# Altium PCB PCB1.PcbDoc
Units mil, origin at the board's own origin, x right, y up, seen from the top; angles counter-clockwise.
Board outline 2414.87 x 2632.61 mil, 2 copper layers (Top Layer, Bottom Layer), stack 61.855 mil thick; 55 components, 29 nets, 125 pads, 37 vias.
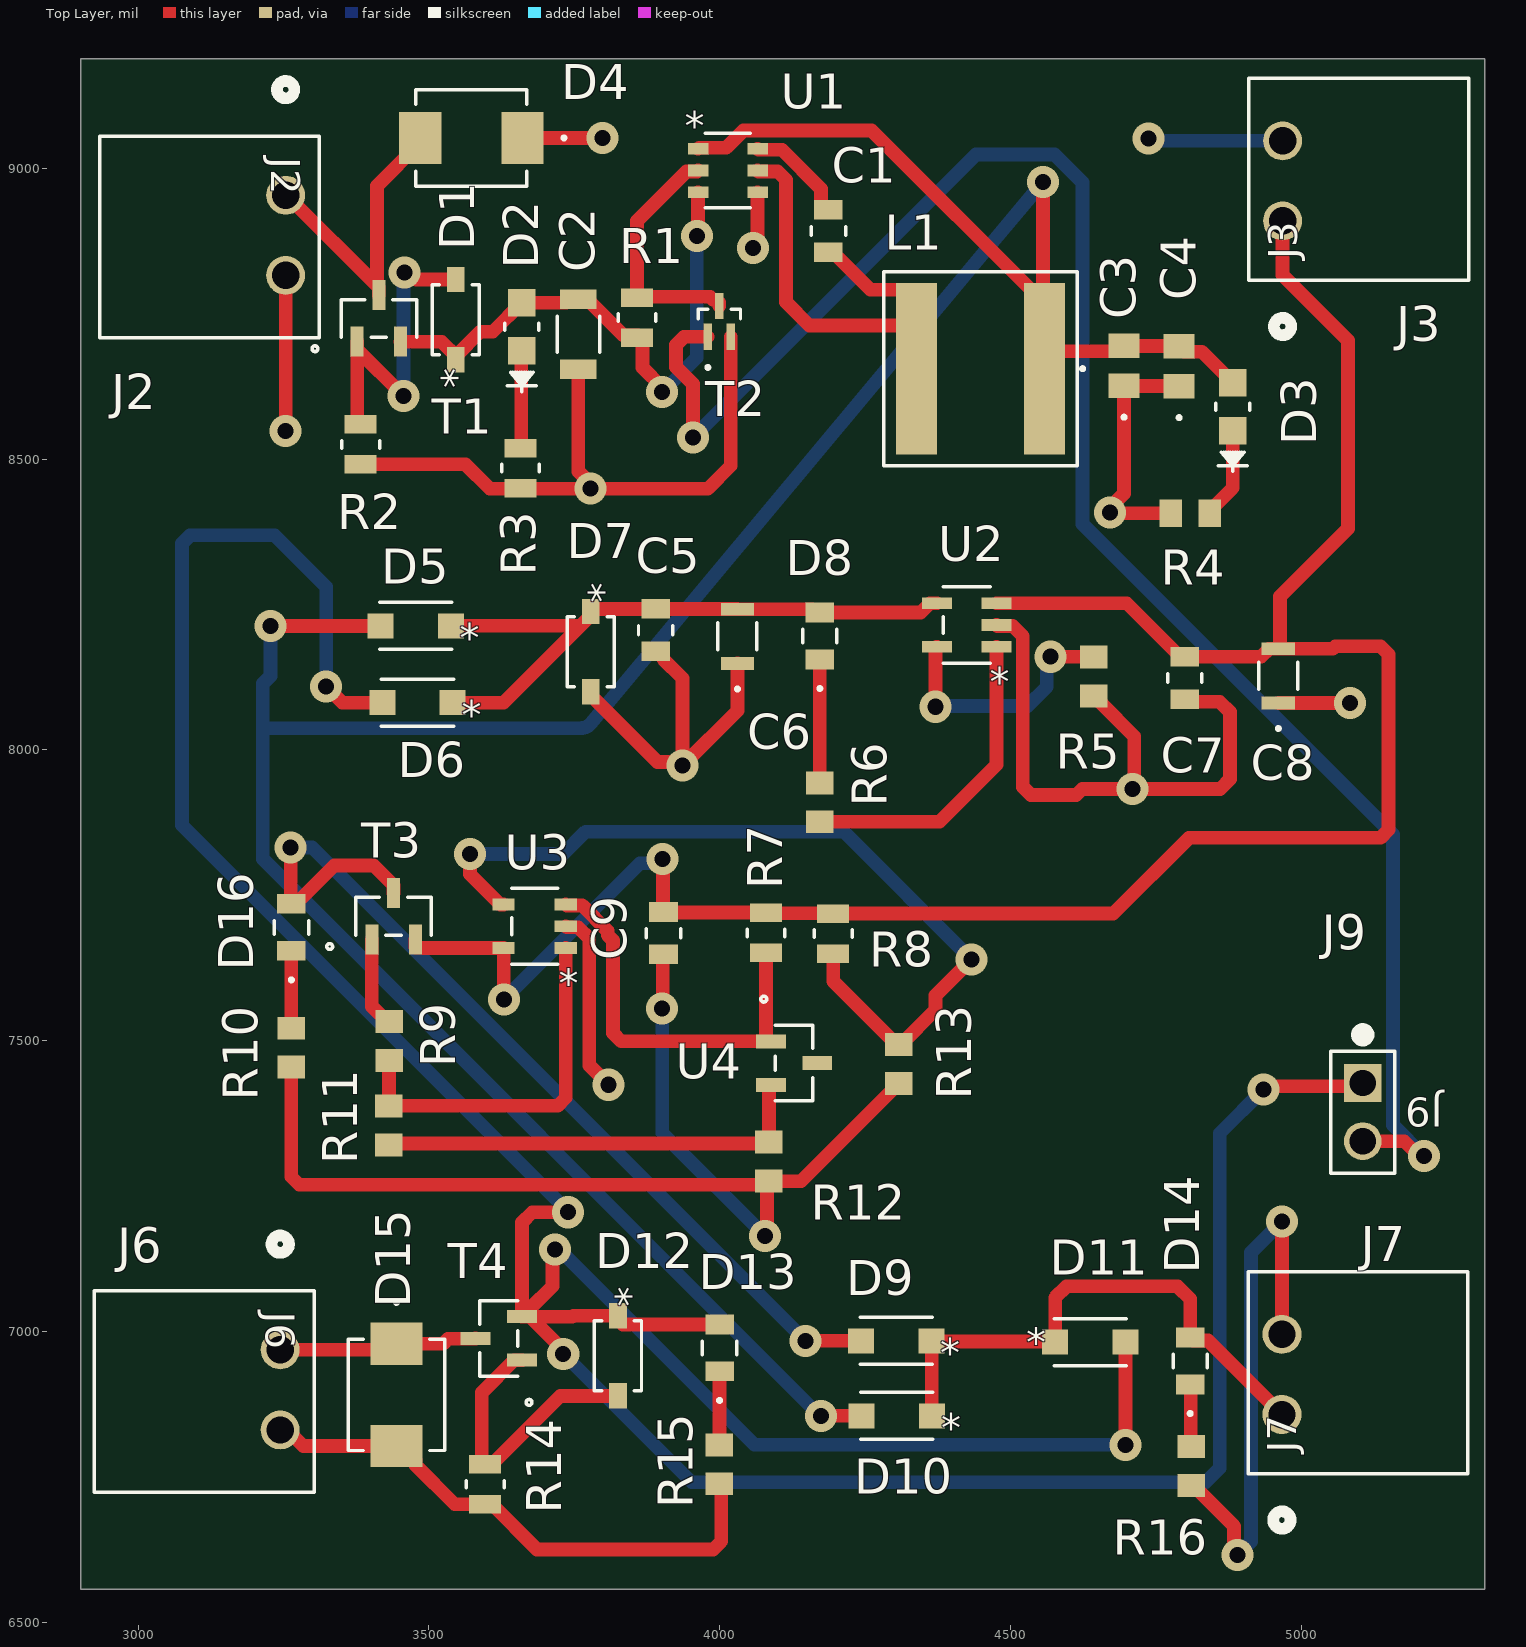
[diagram p0: Top Layer view]
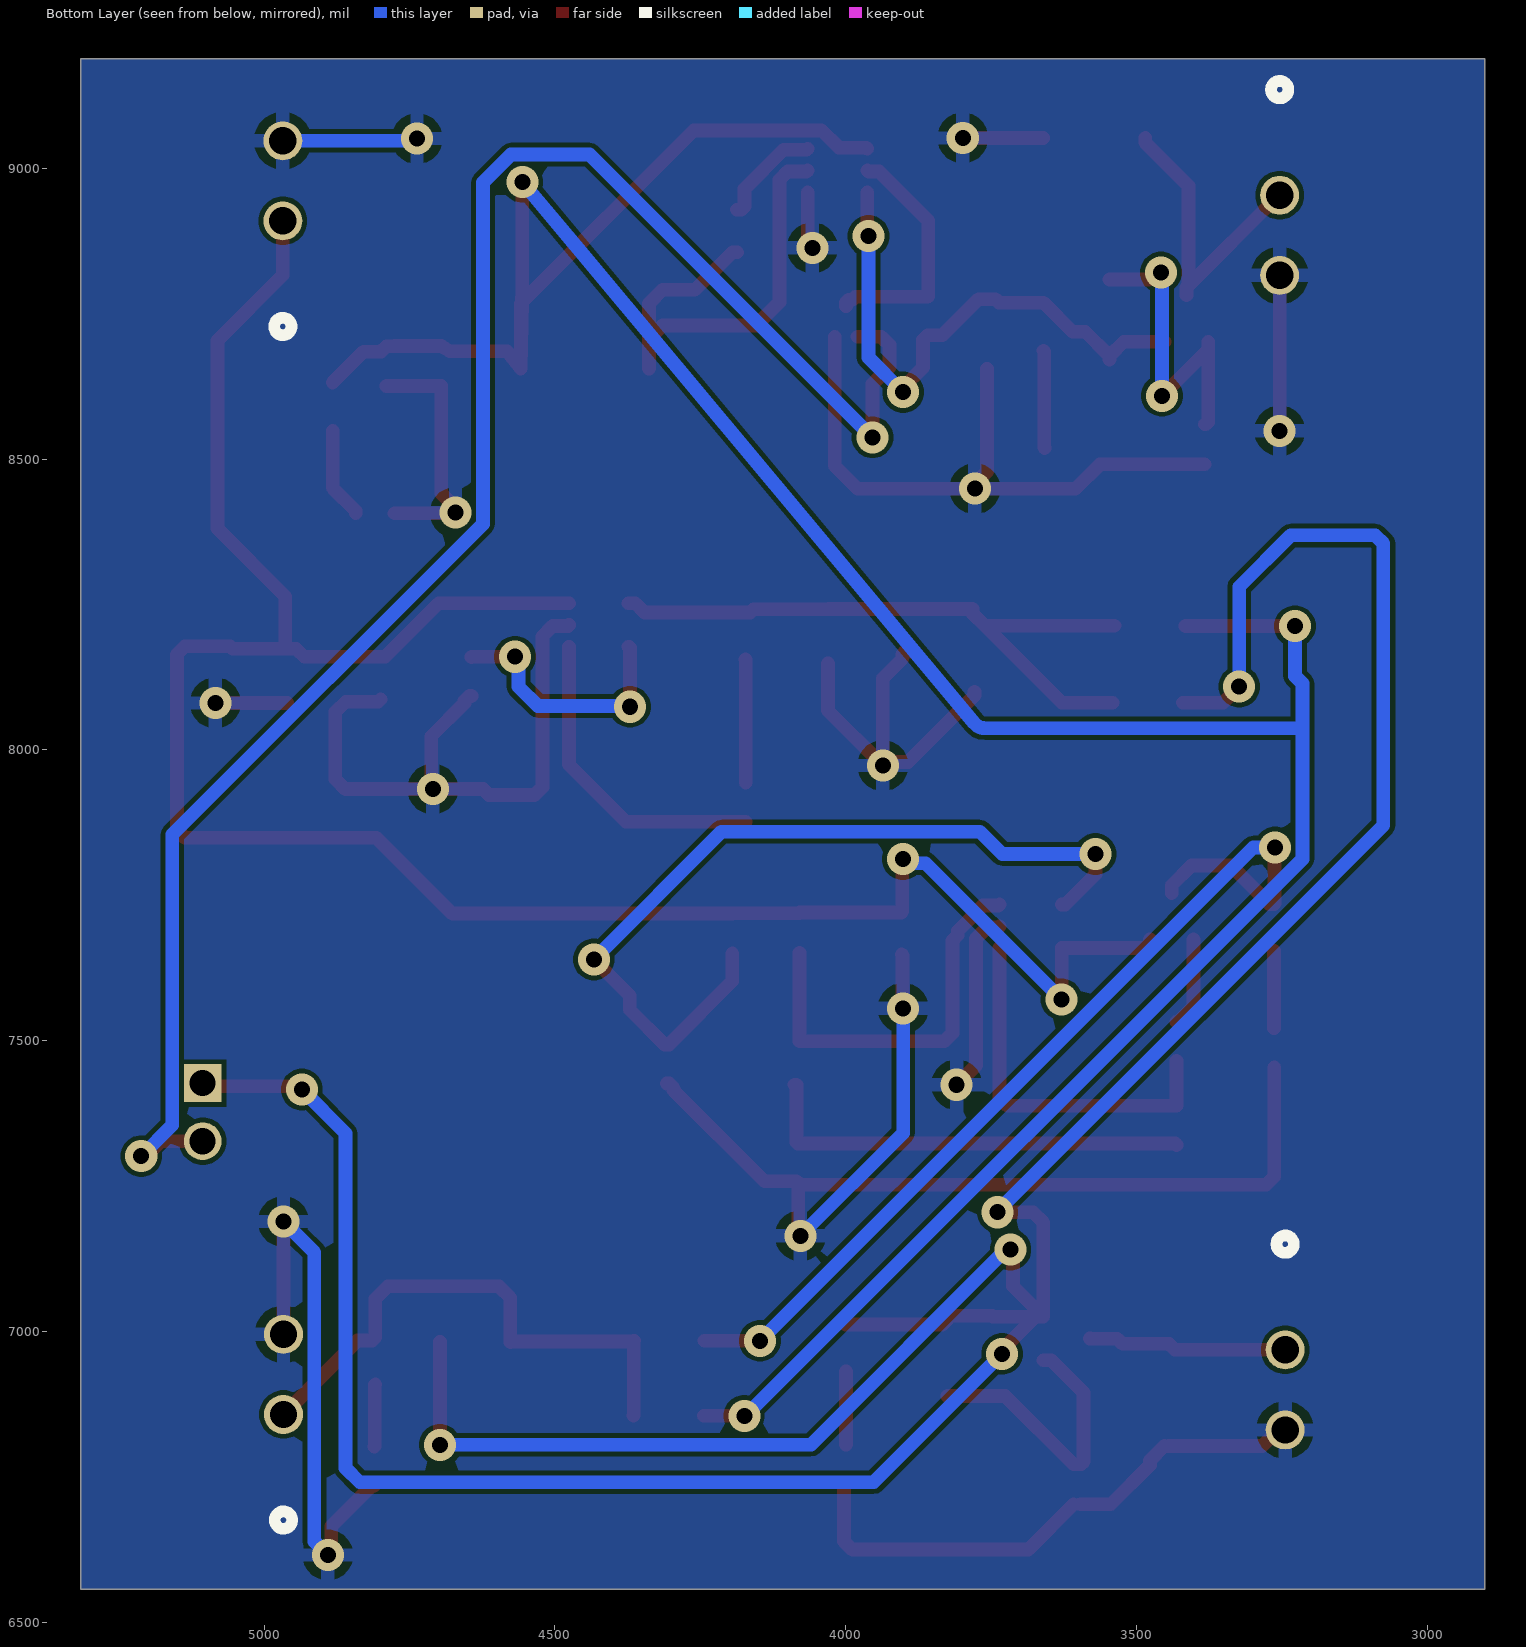
[diagram p1: Bottom Layer view, seen from below]
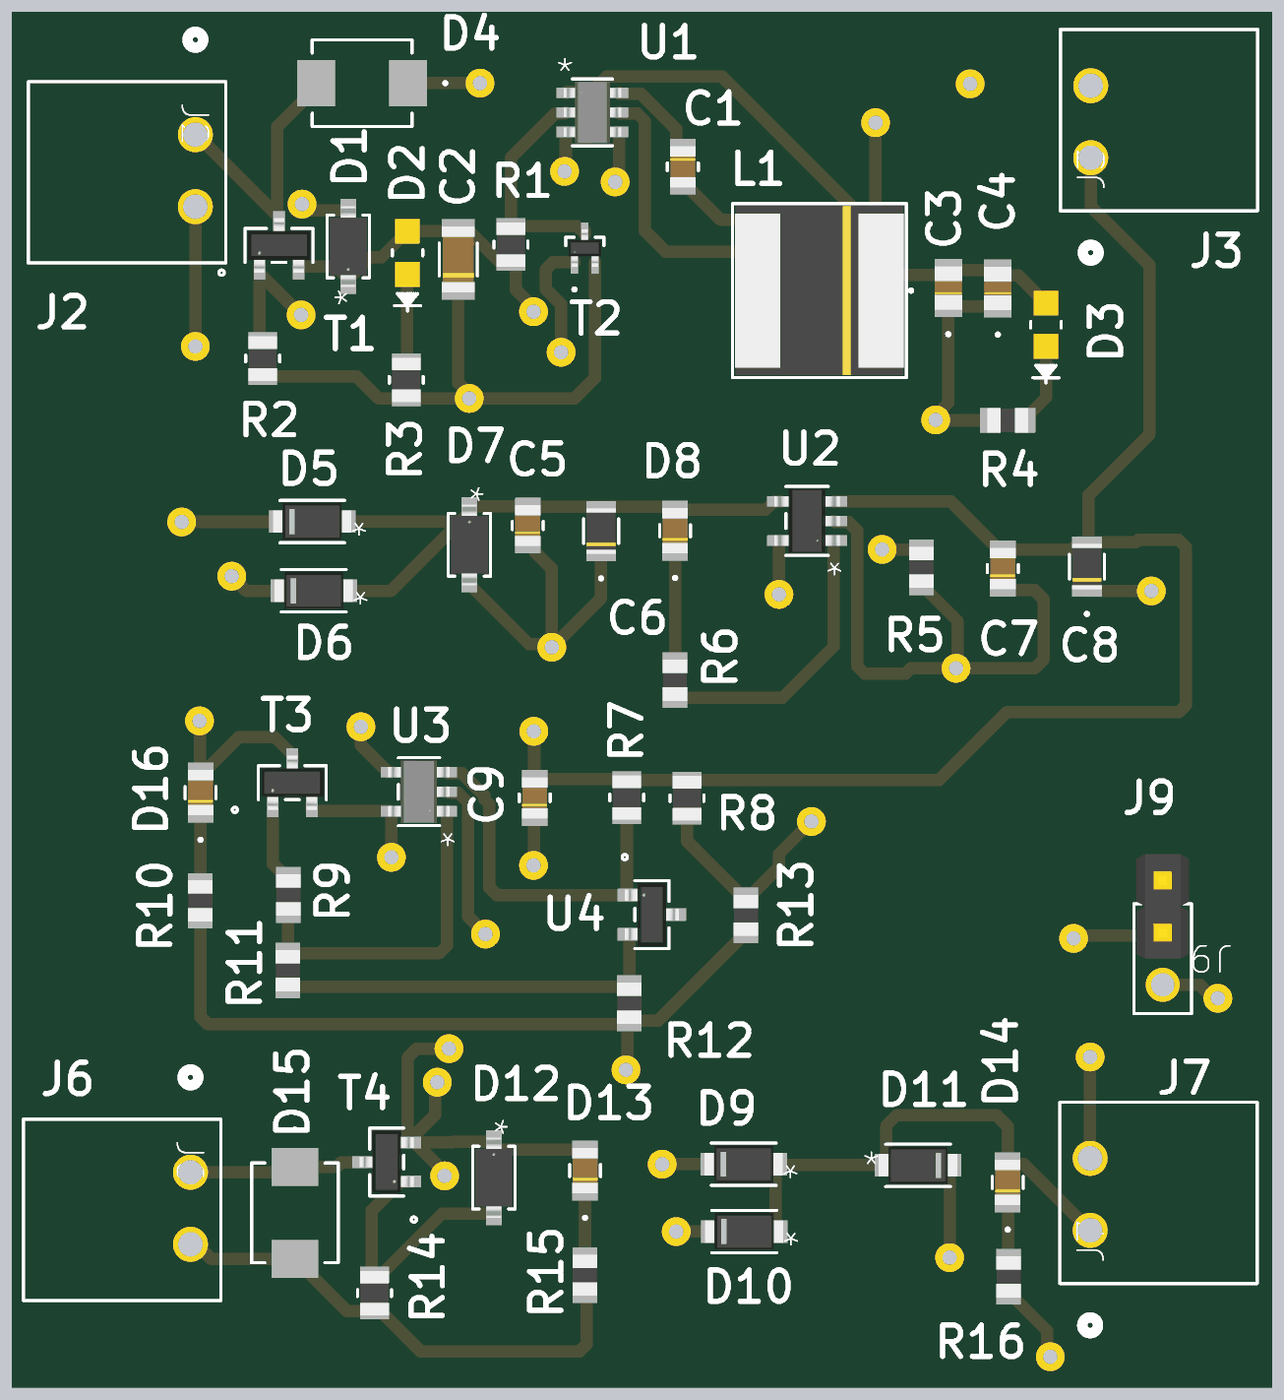
[diagram p2: 3D render of the assembled board from above, using the file's embedded part models]

## Layer stack, top to bottom
Top Solder: solder mask 1, SM-003, Dk 4
Top Layer: signal copper 1.4
Dielectric 1: dielectric 59.0551, FR-4, Dk 4.8
Bottom Layer: signal copper 1.4
Bottom Solder: solder mask 1, SM-003, Dk 4

## Board outline
2900.86,6556.37 5315.73,6556.37 5315.73,9188.98 2900.86,9188.98

## Design rules (kind name [scope] priority, off if disabled: settings)
Clearance [All] p1: gap=7.87 ignorepadtopadclearanceinfootprint=FALSE
MinimumSolderMaskSliver [All] p1: minsoldermaskwidth=3.94
PolygonConnect [All] p1: connectstyle=Relief reliefconductorwidth=23.62 reliefentries=4 polygonreliefangle="90 Angle" airgapwidth=15.75
RoutingVias [All] p1: holewidth=27.56 width=55.12 viastyle="Through Hole" minholewidth=27.56 minwidth=55.12 maxholewidth=27.56 maxwidth=55.12
SilkToSilkClearance [All] p1: silktosilkclearance=0
SilkToSolderMaskClearance [IsPad] p1: minsilkscreentomaskgap=0 clearancetoexposedcopper=TRUE
SolderMaskExpansion [All] p1: expansion=0 istentingtop=FALSE
SupplyNets "Schematic Supply Nets_7" [InNet('VBUS')] p1: voltage=0.000
SupplyNets "Schematic Supply Nets_6" [InNet('+5V_Ext')] p2: voltage=0.000
SupplyNets "Schematic Supply Nets_5" [InNet('+3.7V')] p3: voltage=0.000
SupplyNets "Schematic Supply Nets_4" [InNet('V_Battery')] p4: voltage=0.000
SupplyNets "Schematic Supply Nets_3" [InNet('VSYS')] p5: voltage=0.000
SupplyNets "Schematic Supply Nets_2" [InNet('VCC')] p6: voltage=0.000
SupplyNets "Schematic Supply Nets_1" [InNet('GND')] p7: voltage=0.000
SupplyNets "Schematic Supply Nets" [InNet('+5V_USB')] p8: voltage=0.000
Width [All] p1: maxlimit=78.74 minlimit=15.75 preferedwidth=23.62
27 further rules are at their usual default settings.

## Classes and differential pairs
component class Sheet6: D9 D10 D11 D12 D13 D14 D15 J6 J7 J9 MOSFET3 R14 R15 R16 T4
component class Sheet5: C9 D16 J3 R7 R8 R9 R10 R11 R12 R13 T3 U3 U4
component class Sheet4: C5 C6 C7 C8 D5 D6 D7 D8 R5 R6 U2
component class Sheet3: C1 C2 C3 C4 D1 D2 D3 D4 J2 L1 R1 R2 R3 R4 T1 T2 U1

## Components (designator, comment, footprint, x,y, rotation, side; value= is the part's Value field where it differs from the comment)
C1 "100nF, 25V" CAP_CL21_SAM 4186.93,8892.54 r270 top
C2 "10uF, 50V" CAP_CL31_SAM 3756.9,8715.11 r90 top
C3 "22uF, 25V" CAP_CL_21_SAM 4695.36,8660.52 r90 top
C4 "22uF, 25V" CAP_CL_21_SAM 4790.09,8659.71 r90 top
C5 "100nF, 25V" CAP_CL21_SAM 3889.93,8206.03 r90 top
C6 "4.7uF, 25V" CAP_2012_TDK 4030.45,8195.38 r90 top
C7 "100nF, 25V" CAP_CL21_SAM 4799.7,8123.79 r90 top
C8 "4.7uF, 25V" CAP_2012_TDK 4960.61,8127.4 r90 top
C9 "100nF" CAP_CL21_SAM 3903.37,7684.88 r90 top
D1 "MMSZ5246B-TP" ZDO_SOD123_MCC 3546.26,8739.94 r90 top
D2 "LTST-C170TBKT" LED_LTST-C170_DIO 3659.81,8727.95 r90 top
D3 "LTST-C170TBKT" LED_LTST-C170_DIO 4882.26,8590.41 r90 top
D4 "SMBJ6.0CA-TR" SMB_BI_STM 3572.82,9052.58 r180 top
D5 "MBR120VLSFT1G" SDO_SOD-123FL_ONS 3477.35,8213.52 r180 top
D6 "MBR120VLSFT1G" SDO_SOD-123FL_ONS 3480.25,8081.22 r180 top
D7 "MMSZ5246B-TP" ZDO_SOD123_MCC 3778.37,8169.11 r270 top
D8 "VAOL-S8SB4" LED_VCCLITE_0805_VCC 4172.11,8196 r90 top
D9 "MBR120VLSFT1G" SDO_SOD-123FL_ONS 4303.55,6983.95 r180 top
D10 "MBR120VLSFT1G" SDO_SOD-123FL_ONS 4304.56,6854.97 r180 top
D11 "MBR120VLSFT1G" SDO_SOD-123FL_ONS 4637.31,6981.75 r0 top
D12 "MMSZ5246B-TP" ZDO_SOD123_MCC 3824.98,6958.17 r270 top
D13 "VAOL-S8SB4" LED_VCCLITE_0805_VCC 3999.74,6971.67 r90 top
D14 "VAOL-S8SB4" LED_VCCLITE_0805_VCC 4809.09,6949.17 r90 top
D15 "SMBJ6.0CA-TR" SMB_BI_STM 3444.13,6890.75 r270 top
D16 "VAOL-S8SB4" LED_VCCLITE_0805_VCC 3263.38,7694.87 r90 top
J2 "TSW-101-07-G-D" CONN_1844210_PXC 3253.53,8953.99 r270 top
J3 "TSW-101-07-G-D" CONN_1844210_PXC 4967.99,8909.85 r90 top
J6 "TSW-101-07-G-D" CONN_1844210_PXC 3244.16,6968.43 r270 top
J7 "TSW-101-07-G-D" CONN_1844210_PXC 4966.87,6857.27 r90 top
J9 "CON1" TSW-101-07-G-D_SAI 5105.82,7427.2 r180 top
L1 "4.7uH" IND_TAIYO_NRS8040_TAY 4448.55,8655.64 r180 top
R1 "100kR" RES0805_CRG_TYCO_TYC 3857.75,8743.64 r90 top
R2 "10kR" RES0805_CRG_TYCO_TYC 3382.48,8525.6 r270 top
R3 "1kR" RES0805_CRG_TYCO_TYC 3657.4,8484.82 r270 top
R4 "470R" RC0805N_VIS 4809.17,8407.23 r180 top
R5 "2kR" RC0805N_PAN 4643.61,8126.2 r270 top
R6 "470R" RC0805N_VIS 4171.83,7910.03 r270 top
R7 "10KR" RES0805_CRG_TYCO_TYC 4079.56,7685.48 r270 top
R8 "100KR" RES0805_CRG_TYCO_TYC 4195.04,7684.29 r270 top
R9 "1 MR" RC0805N_PAN 3431.61,7499.19 r270 top
R10 "470R" RC0805N_VIS 3263.13,7487.93 r270 top
R11 "270kR" RC0805N_PAN 3430.73,7354.38 r270 top
R12 "16kR" RC0805N_PAN 4084.67,7291.92 r270 top
R13 "330kR" RC0805N_PAN 4307.75,7459.98 r270 top
R14 "10KR" RES0805_CRG_TYCO_TYC 3596.65,6737.21 r270 top
R15 "470R" RC0805N_VIS 3999.29,6771.58 r270 top
R16 "470R" RC0805N_VIS 4810.74,6768.45 r270 top
T1 "SI2319CDS-T1-GE3" SOT-23-3_TO-236_VIS 3413.82,8742.06 r0 top
T2 "RN1103(TE85L,F)" SSM_TOS 3999.23,8737.02 r0 top
T3 "SI2319CDS-T1-GE3" SOT-23-3_TO-236_VIS 3439.17,7713.95 r0 top
T4 "T4" SOT-23-3_TO-236_VIS 3619.98,6988.01 r90 top
U1 "AP63205WU-7" SOIC_05WU-7_DIO 4013.88,8996.58 r0 top
U2 "MCP73831T-2ACI/OT" SOT-23-5_MC_MCH 4424.85,8214.86 r180 top
U3 "TLV7031QDBVRQ1" SOT_DBVRQ1_TEX 3681.63,7696.79 r180 top
U4 "LM4041DYM3-1.2-TR" SOT-23_MC_MCH 4127.75,7461.46 r270 top

## Footprints (in the part's own frame and the unit in brackets; to place one, negate y for a bottom-side part, rotate by r counter-clockwise, add the part's x,y. Pads: shape width x height; smd on the part's side, far side on the other; paste and mask are expansions set on the pad)
CAP_2012_TDK [mil]
  rect 22x57 smd paste+0 mask+0: 1(-46.5,0) 2(46.5,0)
  silkscreen extent -93,-34 23,34, body extent -44,-29 44,29, height 49
CAP_CL21_SAM [mm]
  rect 0.856x1.25 smd paste+0 mask+0: 1(-0.928,0) 2(0.928,0)
  silkscreen extent -0.19,-0.75 0.19,0.75, body extent -1,-0.63 1,0.63, height 1.35
CAP_CL31_SAM [mm]
  rect 0.856x1.6 smd paste+0 mask+0: 1(-1.528,0) 2(1.528,0)
  silkscreen extent -0.79,-0.93 0.79,0.93, body extent -1.6,-0.8 1.6,0.8, height 1
CAP_CL_21_SAM [mil]
  rect 41.78x53 smd paste+0 mask+0: 1(-34.39,0) 2(34.39,0)
  silkscreen extent -91,-3 -85,3, body extent -41,-26 41,26, height 53
CONN_1844210_PXC [mil]
  round 67 hole 47 paste-99999 mask+0: 1(0,0) 2(137.8,0)
  silkscreen extent -197,-320 245,58
IND_TAIYO_NRS8040_TAY [mil]
  rect 70.5x295 smd paste+0 mask+0: 1(-110.25,0) 2(110.25,0)
  silkscreen extent -178,-167 167,167, body extent -161,-162 161,162, height 165
LED_LTST-C170_DIO [mm]
  rect 1.2x1.2 smd paste-0.6 mask+0: 1(-1.05,0) 2(1.05,0)
  silkscreen extent -2.83,-0.74 0.15,0.74
LED_VCCLITE_0805_VCC [mil]
  rect 33.78x49 smd paste+0 mask+0: 1(-40.39,0) 2(40.39,0)
  silkscreen extent -93,-30 11,30, body extent -44,-24 44,24, height 51
RC0805N_PAN [mm]
  rect 1.006x1.2 smd paste+0 mask+0: 1(-0.853,0) 2(0.853,0)
  body extent -1,-0.6 1,0.6, height 0.71
RC0805N_VIS [mm]
  rect 1x1.2 smd paste+0 mask+0: 1(-0.85,0) 2(0.85,0)
  body extent -1,-0.6 1,0.6, height 0.71
RES0805_CRG_TYCO_TYC [mil]
  rect 31.87x55 smd paste+0 mask+0: 1(-34.44,0) 2(34.44,0)
  silkscreen extent -6,-32 6,32, body extent -43,-27 43,27, height 26
SDO_SOD-123FL_ONS [mil]
  rect 44.87x43 smd paste+0 mask+0: 1(-60.44,0) 2(60.44,0)
  silkscreen extent -62,-41 62,41, body extent -75,-36 75,36, height 39
SMB_BI_STM [mil]
  rect 72.78x88.97 smd paste+0 mask+0: 1(-87.89,0) 2(87.89,0)
  silkscreen extent -162,-83 96,83
SOIC_05WU-7_DIO [mm]
  rect 0.896x0.507 smd paste+0 mask+0: 1(-1.299,0.95) 2(-1.299,0) 3(-1.299,-0.95) 4(1.299,-0.95) 5(1.299,0) 6(1.299,0.95)
  silkscreen extent -0.98,-1.63 0.98,1.63, body extent -1.4,-1.5 1.4,1.5, height 0.99
SOT-23-3_TO-236_VIS [mil]
  rect 22.36x51.56 smd paste+0 mask+0: 1(-37.4,-40) 2(37.4,-40) 3(0,40)
  silkscreen extent -115,-57 65,32, body extent -60,-52 60,52, height 44
SOT-23-5_MC_MCH [mil]
  rect 51.56x20 smd paste+0 mask+0: 1(-51,37.4) 2(-51,0) 3(-51,-37.4) 4(51,-37.4) 5(51,37.4)
  silkscreen extent -41,-66 41,66, body extent -63,-61 63,61, height 57
SOT-23_MC_MCH [mm]
  rect 0.619x1.31 smd paste+0 mask+0: 1(-0.95,-1.015) 2(0.95,-1.015) 3(0,1.015)
  silkscreen extent -2.92,-1.45 1.65,0.83, body extent -1.53,-1.32 1.53,1.32, height 1.12
SOT_DBVRQ1_TEX [mil]
  rect 38.28x20 smd paste+0 mask+0: 1(-53.64,37.4) 2(-53.64,0) 3(-53.64,-37.4) 4(53.64,-37.4) 5(53.64,37.4)
  silkscreen extent -40,-65 40,65, body extent -59,-60 59,60, height 43
SSM_TOS [mm]
  rect 0.36x1.15 smd paste+0 mask+0: 1(-0.5,-0.675) 2(0.5,-0.675) 3(0,0.675)
  silkscreen extent -0.93,-2.09 0.93,0.53, body extent -0.8,-0.9 0.8,0.9, height 0.8
TSW-101-07-G-D_SAI [mil]
  rect 65x65 hole 45 paste-99999 mask+0: 1(0,0)
  round 65 hole 45 paste-99999 mask+0: 2(0,100)
  silkscreen extent -55,-93 55,155, body extent -50,-150 50,50, height 330
ZDO_SOD123_MCC [mil]
  rect 43.56x30.36 smd paste+0 mask+0: 1(-69,0) 2(69,0)
  silkscreen extent -60,-41 60,41, body extent -77,-36 77,36, height 53

## Part data
C1 C5 C7 C9: library part CL21B104KACNNNC, "Description", Manufacturer_Name=Samsung, Copyright="Copyright (C) 2025 Ultra Librarian. All rights reserved.", Manufacturer_Part_Number=CL21B104KACNNNC
C2: library part CL31A106KBHNNNE, "Description", Manufacturer_Name=Samsung, Copyright="Copyright (C) 2025 Ultra Librarian. All rights reserved.", Manufacturer_Part_Number=CL31A106KBHNNNE
C3 C4: library part CL21A226MAYNNNE, "Description", Manufacturer_Name=Samsung, Copyright="Copyright (C) 2025 Ultra Librarian. All rights reserved.", Manufacturer_Part_Number=CL21A226MAYNNNE
C6 C8: library part C2012X5R1E475K125AB, "CAP CER 4.7UF 25V X5R 0805", Manufacturer_Name=TDK, Copyright="Copyright (C) 2026 Ultra Librarian. All rights reserved.", Manufacturer_Part_Number=C2012X5R1E475K125AB
D1 D7 D12: "DIODE ZENER 16V 500MW SOD123", Manufacturer_Name=MCC, Copyright="Copyright (C) 2026 Ultra Librarian. All rights reserved.", Manufacturer_Part_Number=MMSZ5246B-TP
D2 D3: "No Description Available", Manufacturer_Name="Diodes Inc", Copyright="Copyright (C) 2026 Ultra Librarian. All rights reserved.", Manufacturer_Part_Number=LTST-C170TBKT
D4 D15: "600 W, 6 V TVS in SMB", Manufacturer_Name=STMicroelectronics, Copyright="Copyright (C) 2026 Ultra Librarian. All rights reserved.", Datasheet=https://www.st.com/resource/en/datasheet/smbj58ca.pdf, Manufacturer_Part_Number=SMBJ6.0CA-TR, RefDes=RefDes, Type=Type
D5 D6 D9 D10 D11: "No Description Available", Manufacturer_Name=onsemi, Copyright="Copyright (C) 2026 Ultra Librarian. All rights reserved.", Manufacturer_Part_Number=MBR120VLSFT1G
D8 D13 D14 D16: "No Description Available", Manufacturer_Name=VCC, Copyright="Copyright (C) 2026 Ultra Librarian. All rights reserved.", Manufacturer_Part_Number=VAOL-S8SB4
J2 J3 J6 J7: "No Description Available", Manufacturer_Name="Samtec Inc", Copyright="Copyright (C) 2026 Ultra Librarian. All rights reserved.", Manufacturer_Part_Number=TSW-101-07-G-D, RefDes=RefDes, Type=Type
J9: library part TSW-101-07-G-D, "No Description Available", Manufacturer_Name="Samtec Inc", Copyright="Copyright (C) 2026 Ultra Librarian. All rights reserved.", Manufacturer_Part_Number=TSW-101-07-G-D, RefDes=RefDes, Type=Type
L1: library part NRS8040T4R7NJGJ, "No Description Available", Manufacturer_Name="TAIYO YUDEN", Copyright="Copyright (C) 2026 Ultra Librarian. All rights reserved.", Manufacturer_Part_Number=NRS8040T4R7NJGJ
R1 R8: library part CRG0805F100K, "CRG0805 1% 100K", Manufacturer_Name="TE Connectivity", Copyright="Copyright (C) 2026 Ultra Librarian. All rights reserved.", Datasheet=https://www.te.com/commerce/DocumentDelivery/DDEController?Action=srchrtrv&DocNm=1773204&DocType=Data+Sheet&DocLang=English&PartCntxt=1623095-1&DocFormat=pdf, Manufacturer_Part_Number=CRG0805F100K
R2 R7 R14: library part CRG0805F10K, "CRG0805 1% 10K", Manufacturer_Name="TE Connectivity", Copyright="Copyright (C) 2026 Ultra Librarian. All rights reserved.", Manufacturer_Part_Number=CRG0805F10K
R3: library part CRG0805F1K0, "CRG0805 1% 1K0", Manufacturer_Name="TE Connectivity", Copyright="Copyright (C) 2026 Ultra Librarian. All rights reserved.", Datasheet=https://www.te.com/commerce/DocumentDelivery/DDEController?Action=srchrtrv&DocNm=1773204&DocType=Data+Sheet&DocLang=English&PartCntxt=1623131-1&DocFormat=pdf, Manufacturer_Part_Number=CRG0805F1K0
R4 R6 R10 R15 R16: library part CRCW0805470RJNEA, "No Description Available", Manufacturer_Name=Vishay, Copyright="Copyright (C) 2026 Ultra Librarian. All rights reserved.", Datasheet=https://www.vishay.com/doc?20035, Manufacturer_Part_Number=CRCW0805470RJNEA
R5: library part ERJ-6ENF2001V, "Description", Manufacturer_Name=Panasonic, Copyright="Copyright (C) 2025 Ultra Librarian. All rights reserved.", Manufacturer_Part_Number=ERJ-6ENF2001V
R9: library part ERJ-6ENF1004V, "Description", Manufacturer_Name=Panasonic, Copyright="Copyright (C) 2026 Ultra Librarian. All rights reserved.", Manufacturer_Part_Number=ERJ-6ENF1004V
R11: library part ERJ-6ENF2703V, "No Description Available", Manufacturer_Name=Panasonic, Copyright="Copyright (C) 2026 Ultra Librarian. All rights reserved.", Manufacturer_Part_Number=ERJ-6ENF2703V
R12: library part ERJ-6ENF1602V, "No Description Available", Manufacturer_Name=Panasonic, Copyright="Copyright (C) 2026 Ultra Librarian. All rights reserved.", Manufacturer_Part_Number=ERJ-6ENF1602V
R13: library part ERJ-6ENF3303V, "No Description Available", Manufacturer_Name=Panasonic, Copyright="Copyright (C) 2026 Ultra Librarian. All rights reserved.", Manufacturer_Part_Number=ERJ-6ENF3303V
T1 T3: "P-CHANNEL 40-V (D-S) MOSFET", Manufacturer_Name=Vishay, Copyright="Copyright (C) 2026 Ultra Librarian. All rights reserved.", Datasheet=https://www.vishay.com/doc?66709, Manufacturer_Part_Number=SI2319CDS-T1-GE3
T2: library part RN1103TE85L,F, "No Description Available", Manufacturer_Name="Toshiba Electronic Devices & Storage Corp.", Copyright="Copyright (C) 2026 Ultra Librarian. All rights reserved.", Manufacturer_Part_Number=RN1103(TE85L,F), RefDes=Refdes, Type=Type
T4: library part SI2319CDS-T1-GE3, "P-CHANNEL 40-V (D-S)", Manufacturer_Name=Vishay, Copyright="Copyright (C) 2026 Ultra Librarian. All rights reserved.", Datasheet=https://www.vishay.com/doc?66709, Manufacturer_Part_Number=SI2319CDS-T1-GE3
U1: "Description", Manufacturer_Name="Diodes Inc", Copyright="Copyright (C) 2025 Ultra Librarian. All rights reserved.", Manufacturer_Part_Number=AP63205WU-7, RefDes=RefDes, Type=Type
U2: library part MCP73831T-2ACIOT, "Description", Manufacturer_Name=Microchip, Copyright="Copyright (C) 2026 Ultra Librarian. All rights reserved.", Manufacturer_Part_Number=MCP73831T-2ACI/OT, RefDes=RefDes, Type=Type
U3: "Automotive nano power comparator with push-pull output 5-SOT-23 -40 to 125", Manufacturer_Name="Texas Instruments", Copyright="Copyright (C) 2026 Ultra Librarian. All rights reserved.", Datasheet=https://www.ti.com/lit/gpn/tlv7031-q1, Manufacturer_Part_Number=TLV7031QDBVRQ1, RefDes=RefDes, Type=Type
U4: "No Description Available", Manufacturer_Name=Microchip, Copyright="Copyright (C) 2026 Ultra Librarian. All rights reserved.", Manufacturer_Part_Number=LM4041DYM3-1.2-TR, RefDes=RefDes, Type=Type

## Via types
v1: diameter 55.12, hole 27.56, Top Layer to Bottom Layer, 37 vias

## Nets (pads, with @x,y where several pads share a name; then routed paths per layer and width w, separated by ;. In a path a pad name is that pad's centre, name@x,y a point inside that pad or via, vN(x,y) a via of type N, cw(c..) or ccw(c..) an arc to the next point about the centre after c; other vN are vias at no path point)
+3.7V: D9.2 D16.2 T3.3 | length 1661.3
  Top Layer w23.62: v1(3261.53,7832.21) 3262.45,7831.28 3262.45,7736.19 D16.2 3270.99,7735.26 3337.13,7801.4 3405.05,7801.4 3439.17,7767.28 T3.3 ; v1(4147.4,6983.95) D9.2
  Bottom Layer w23.62: v1(3261.53,7832.21) 3299.14,7832.21 v1(4147.4,6983.95)
+5V_Ext: C3.2 C4.2 D3.2 D5.2 D10.2 L1.1 U1.1 | length 5333.1
  Top Layer w23.62: v1(3227.29,8212.84) 3227.63,8213.18 D5.2@3415.64,8213.18 ; U1.1 3964.57,9035.8 4011.38,9035.8 4041.05,9065.47 4261.21,9065.47 L1.1@4556.44,8770.24 ; v1(4174.34,6854.97) D10.2 ; v1(4556.01,8976.98) 4556.01,8791.33 L1.1@4556.44,8770.24 ; D3.2 4829.01,8685.02 4799.17,8685.02 C4.2 4775.4,8694.78 4710.05,8694.78 C3.2 4680.67,8685.83 4582.24,8685.83 L1.1 ; D5.2@3415.64,8213.18 D5.2@3415.67,8213.22 ; L1.1@4556.44,8770.24 4558.8,8767.89 L1.1 ; L1.1@4556.44,8770.24 L1.1
  Bottom Layer w23.62: v1(3227.29,8212.84) 3227.29,8127.34 3214.28,8114.33 3214.28,8037.35 ; v1(4174.34,6854.97) 4171.96,6854.97 3214.28,7812.64 3214.28,8037.35 ; v1(4556.01,8976.98) 4464.48,8867.37 3778.49,8045.83 cw(c3760.36,8060.98) 3760.36,8037.35 3214.28,8037.35
+5V_USB: D6.2 D11.2 D12.1 D13.2 J9.1 T4.2 | length 6192
  Top Layer w23.62: v1(3323.19,8109.07) 3351.04,8081.22 D6.2 ; T4.2 T4.2@3673.32,7025.41 ; T4.2@3659.98,7026.04 3659.98,7187.39 3677.6,7205.02 v1(3739.18,7205.02) ; T4.2@3673.95,7026.04 3673.95,7039.38 3712.32,7077.75 3712.32,7136.22 v1(3716.85,7140.74) ; v1(3730.87,6961.57) 3730.87,6967.85 T4.2@3673.32,7025.41 ; D12.1@3824.98,7020.57 3833.49,7012.06 D13.2 ; D12.1 3748.34,7027.17 3746.58,7025.41 T4.2@3673.32,7025.41 ; v1(4697.75,6805.09) D11.2 ; v1(4935.15,7416.02) 4940.74,7421.61 5100.23,7421.61 J9.1
  Bottom Layer w23.62: v1(3323.19,8109.07) 3323.19,8280.62 3234.74,8369.08 3089.17,8369.08 3075.33,8355.24 3075.33,7870.48 3739.18,7206.63 v1(3739.18,7205.02) ; v1(3716.85,7140.74) 3724.05,7140.74 4059.7,6805.09 v1(4697.75,6805.09) ; v1(3730.87,6961.57) 3951.85,6740.59 4835.67,6740.59 4859.96,6764.88 4859.96,7340.82 v1(4935.15,7416.02)
GND: C2.1 C3.1 C4.1 C5.1 C6.1 C7.1 C8.1 C9.1 D4.1 D7.2 D15.2 J2.2 J3.2 J6.2 J7.2 R2.2 R3.2 R4.2 R5.2 R10.2 R12.2 R13.2 R14.2 R15.2 R16.2 T2.2 U1.4 U2.2 U3.2 | length 8294.7
  Top Layer w23.62: J6.2 3255.9,6830.63 3283.67,6802.86 D15.2 ; v1(3253.53,8548.82) J2.2 ; R10.2 3263.13,7266.14 3276.97,7252.3 4078.63,7252.3 R12.2 ; R2.2 3562.85,8491.17 3604.72,8449.3 v1(3777.93,8449.3) ; D15.2@3452.23,6802.86 3476.8,6778.29 3476.8,6770.19 3544.23,6702.77 R14.2 ; R14.2@3608.22,6702.77 3685.84,6625.15 3988.88,6625.15 4002.72,6638.99 4002.72,6734.69 R15.2 ; D4.1 v1(3798.61,9052.58) ; U3.2 3737.08,7694.98 3756.66,7694.98 3775.78,7675.86 3775.78,7457.55 v1(3809.06,7424.27) ; C2.1 3756.9,8478.85 3777.93,8457.82 v1(3777.93,8449.3) ; D7.2 3778.37,8093.51 3892.74,7979.14 3930.01,7979.14 v1(3936.03,7973.11) ; C5.1 3897.69,8169.51 3902.72,8164.48 3902.72,8156.71 3936.03,8123.4 v1(3936.03,7973.11) ; v1(3901.04,7555.7) 3902.2,7556.87 3902.2,7647.18 C9.1 ; T2.2 4018.92,8488.67 3979.55,8449.3 v1(3777.93,8449.3) ; C6.1 4030.45,8067.53 v1(3936.03,7973.11) ; v1(4057.34,8863.51) 4065.02,8871.19 U1.4 ; v1(4078.02,7164.48) 4081.34,7167.81 4081.34,7255.02 R12.2 ; R13.2 4303.93,7426.4 4295.94,7418.42 4295.94,7414.59 4139.7,7258.34 R12.2 ; U2.2 4477.66,8213.05 4503.88,8213.05 4521.32,8195.61 4521.32,7936.38 4535.15,7922.54 4613.17,7922.54 4623.52,7932.88 v1(4710.06,7932.88) ; R5.2 4647.44,8092.62 4655.42,8084.64 4655.42,8080.81 4712.66,8023.57 4712.66,7935.49 v1(4710.06,7932.88) ; R4.2 4672.01,8407.23 v1(4671.11,8408.14) 4671.11,8416.66 4695.36,8440.91 C3.1 4695.77,8625.72 4789.68,8625.72 C4.1 ; C7.1 4803.93,8083.03 4859.74,8083.03 4877.67,8065.1 4877.67,7949.84 4860.71,7932.88 v1(4710.06,7932.88) ; R16.2 4814.68,6734.98 4884.53,6665.13 4884.53,6621.52 v1(4890.55,6615.49) ; C8.1 v1(5083.98,8080.9) ; J7.2 v1(4966.87,7189.02)
  Bottom Layer w23.62: v1(3901.04,7555.7) 3901.04,7341.46 v1(4078.02,7164.48) ; v1(4737.11,9051.33) 4740.8,9047.65 J3.2 ; v1(4890.55,6615.49) 4913.68,6638.62 4913.68,7135.83 v1(4966.87,7189.02)
NetC1_1: C1.1 U1.6 | length 183.4
  Top Layer w23.62: U1.6 4066.85,9032.15 4106.96,9032.15 4174.14,8964.97 4174.14,8934.1 4179.17,8929.07 C1.1
NetC1_2: C1.2 L1.2 U1.5 | length 867.8
  Top Layer w23.62: U1.5 4066.85,8994.75 4099.82,8994.75 4113.91,8980.66 4113.91,8770.18 4154.03,8730.06 4314.86,8730.06 4338.3,8706.62 L1.2 4338.3,8767.89 4314.86,8791.33 4259.39,8791.33 4194.7,8856.02 C1.2
NetC2_2: C2.2 D1.1 D2.2 R1.1 T1.2 U1.3 | length 975.5
  Top Layer w23.62: T1.2 3521.74,8702.06 D1.1@3546.26,8677.54 ; D1.1 D1.1@3546.26,8677.54 ; v1(3901.07,8615.24) 3901.07,8623.76 3867,8657.84 3867,8705.08 3858.74,8713.33 3833.49,8713.33 3771.55,8775.26 C2.2 3742.25,8775.26 3736.28,8769.3 D2.2 3609.71,8719.2 3587.92,8719.2 D1.1@3546.26,8677.54 ; v1(3960.56,8883.75) 3962.74,8885.93 U1.3
  Bottom Layer w23.62: v1(3901.07,8615.24) 3960.56,8674.73 v1(3960.56,8883.75)
NetC5_2: C5.2 C6.2 D5.1 D6.1 D7.1 D8.2 U2.4 | length 1136.2
  Top Layer w23.62: D5.1 3760.38,8213.52 ; D6.1 3628.09,8081.22 3760.38,8213.52 ; U2.4 4361.69,8252.26 4345.82,8236.39 D8.2 4164.5,8236.39 4159.01,8241.88 C6.2 4030.11,8242.22 3890.27,8242.22 C5.2 3781.74,8242.56 3781.74,8234.88 3760.38,8213.52
NetD1_2: D1.2 R2.1 T1.1 | length 577.8
  Top Layer w23.62: R2.1 3380.54,8560.04 3376.42,8564.17 T1.1 3376.42,8688.72 v1(3456.03,8609.11) ; v1(3457.85,8821.11) 3466.38,8821.11 3478.54,8808.94 D1.2
  Bottom Layer w23.62: v1(3456.03,8609.11) 3456.03,8819.28 v1(3457.85,8821.11)
NetD2_1: D2.1 R3.1 | length 168.3
  Top Layer w23.62: R3.1 3658.61,8520.46 3658.61,8685.4 D2.1
NetD3_1: D3.1 R4.1 | length 158.2
  Top Layer w23.62: R4.1 4842.64,8411.17 4882.26,8450.8 D3.1
NetD8_1: D8.1 R6.1 | length 212.2
  Top Layer w23.62: R6.1 4171.97,7943.64 4171.97,8155.47 D8.1
NetD12_2: D12.2 R14.1 T4.1 | length 495.7
  Top Layer w23.62: T4.1 3646.64,6950.61 3590.94,6894.91 3590.94,6775.77 3595.07,6771.64 3608.22,6771.64 3725.74,6889.17 D12.2
NetD13_1: D13.1 R15.1 | length 126.4
  Top Layer w23.62: R15.1 3999.52,6805.27 3999.52,6931.06 D13.1
NetD14_1: D14.1 R16.1 | length 107.5
  Top Layer w23.62: D14.1 4809.91,6907.95 4809.91,6802.74 R16.1
NetD16_1: D16.1 R10.1 | length 133.2
  Top Layer w23.62: R10.1 3263.25,7521.52 3263.25,7654.36 D16.1
NetJ9_2: J9.2 T2.1 | length 3157.4
  Top Layer w23.62: v1(3953.85,8537.63) 3953.85,8629.27 3924.74,8658.38 3924.74,8696.61 3938.58,8710.44 T2.1 ; J9.2 5177.11,7327.2 5202.92,7301.39 v1(5211.44,7301.39)
  Bottom Layer w23.62: v1(3953.85,8537.63) 4440.45,9024.23 4575.58,9024.23 4623.87,8975.94 4623.87,8388.57 5158,7854.43 5158,7354.84 v1(5211.44,7301.39)
NetR1_2: R1.2 T2.3 U1.2 | length 422.3
  Top Layer w23.62: U1.2 3960.91,8994.75 3942.85,8994.75 3857.75,8909.65 3857.75,8780.34 3858.88,8779.21 3983.62,8779.21 3988.41,8774.42 3994.51,8774.42 3999.23,8769.7 T2.3
NetR5_1: R5.1 U2.5 | length 440.2
  Top Layer w23.62: v1(4370.95,8074.32) 4370.95,8175.65 4372.76,8177.46 U2.5 ; v1(4568.56,8160.34) 4643.05,8160.34 R5.1
  Bottom Layer w23.62: v1(4370.95,8074.32) 4372.09,8075.45 4529.31,8075.45 4562.53,8108.68 4562.53,8154.31 v1(4568.56,8160.34)
NetR6_2: R6.2 U2.1 | length 547.5
  Top Layer w23.62: R6.2 4377.9,7876.57 4475.85,7974.52 U2.1
NetR7_2: R7.2 U3.3 U4.1 | length 691.4
  Top Layer w23.62: U3.3 3737.08,7732.38 3763.8,7732.38 3807.27,7688.91 3807.27,7681.77 3816.46,7672.58 3816.46,7513 3830.59,7498.86 4079.19,7498.86 4079.56,7499.23 R7.2
NetR8_2: R8.2 R13.1 U3.4 | length 1489
  Top Layer w23.62: v1(3570.52,7820.91) 3570.52,7786.14 3622.48,7734.19 U3.4 ; R8.2 4195.04,7602.44 4303.93,7493.55 4311.58,7493.55 4371.22,7553.18 4371.22,7577.76 v1(4433.15,7639.69)
  Bottom Layer w23.62: v1(3570.52,7820.91) 3730.8,7820.91 3769.4,7859.51 4213.34,7859.51 v1(4433.15,7639.69)
NetR9_1: R9.1 T3.1 | length 155.8
  Top Layer w23.62: T3.1 3401.77,7558.78 3427.78,7532.76 R9.1
NetR9_2: R9.2 R11.1 U3.1 | length 645.9
  Top Layer w23.62: R9.2 3431.17,7465.17 3431.17,7388.4 R11.1 3721.44,7387.96 3735.27,7401.8 U3.1
NetR11_2: R11.2 R12.1 U4.2 | length 757.4
  Top Layer w23.62: R11.2 3433.07,7323.15 4082.33,7323.15 R12.1 4084.67,7423.69 4085.04,7424.06 U4.2
V_Battery: C7.2 C8.2 C9.2 J3.1 R7.1 R8.1 T3.2 U2.3 U3.5 | length 3886.4
  Top Layer w23.62: T3.2 3476.57,7660.61 3477.2,7659.98 3490.54,7659.98 3491.12,7659.39 U3.5 3628.48,7658.91 3628.48,7571.67 v1(3628.96,7571.19) ; v1(3901.58,7812.27) 3902.48,7811.37 3902.48,7722.3 C9.2 3904.12,7720.66 4078.82,7720.66 R7.1 4080.16,7719.32 4194.45,7719.32 R8.1 4676.76,7718.72 4806.86,7848.83 5136.29,7848.83 5150.13,7862.67 5150.13,8164.64 5136.29,8178.48 5058.68,8178.48 5054.1,8173.9 C8.2 ; U2.3 4699.99,8252.26 4791.94,8160.31 C7.2 4931.14,8160.31 4944.73,8173.9 C8.2 ; J3.1 4967.99,8816.76 5080.31,8704.44 5080.31,8380.64 4963.66,8263.99 4963.66,8174.71 4962.85,8173.9 C8.2
  Bottom Layer w23.62: v1(3628.96,7571.19) 3862.89,7805.12 3894.44,7805.12 v1(3901.58,7812.27)
VBUS: D15.1 J6.1 T4.3 | length 343.9
  Top Layer w23.62: J6.1 3433.91,6968.43 D15.1 3524.05,6978.64 3532.78,6987.38 3579.35,6987.38 T4.3
VCC: D4.2 J2.1 T1.3 | length 528.6
  Top Layer w23.62: J2.1 3255.23,8953.99 T1.3@3413.82,8795.39 ; T1.3 T1.3@3413.82,8795.39 ; D4.2 3484.93,9044.48 3410.61,8970.17 3410.61,8798.6 T1.3@3413.82,8795.39
VSYS: D9.1 D10.1 D11.1 D14.2 J7.1 | length 946.2
  Top Layer w23.62: D9.1 4364.49,6983.44 4364.49,6855.47 D10.1 ; D9.1@4365.09,6982.85 4575.77,6982.85 D11.1 4576.87,7058.16 4596.22,7077.5 4787.52,7077.5 4809.09,7055.94 D14.2 4814.17,6984.48 4839.66,6984.48 J7.1
pads on no net: U4.3

## Polygon pours and split planes (outlines as drawn)
GND on Bottom Layer "bottom_GND" (solid, pour order 0): 2900.86,6556.37 5315.73,6556.37 5315.73,9188.98 2900.86,9188.98

## Text inside footprints (layer, text, board x,y; h text height)
C1: Mechanical 13 "RefDes2" at 4161.93,8980.04 h50 r270
D1: Top Overlay "*" at 3571.26,8621.66 h50 r90; Mechanical 13 "*" at 3571.26,8682.44 h50 r90
D5: Top Overlay "*" at 3587.72,8238.52 h50 r180; Mechanical 13 "*" at 3536.85,8238.52 h50 r180
D6: Top Overlay "*" at 3590.62,8106.22 h50 r180; Mechanical 13 "*" at 3539.75,8106.22 h50 r180
D7: Top Overlay "*" at 3753.37,8287.39 h50 r270; Mechanical 13 "*" at 3753.37,8226.61 h50 r270
D9: Top Overlay "*" at 4413.92,7008.95 h50 r180; Mechanical 13 "*" at 4363.05,7008.95 h50 r180
D10: Top Overlay "*" at 4414.94,6879.97 h50 r180; Mechanical 13 "*" at 4364.06,6879.97 h50 r180
D11: Top Overlay "*" at 4526.94,6956.75 h50; Mechanical 13 "*" at 4577.81,6956.75 h50
D12: Top Overlay "*" at 3799.98,7076.45 h50 r270; Mechanical 13 "*" at 3799.98,7015.67 h50 r270
U1: Top Overlay "*" at 3940.24,9048.95 h50; Mechanical 13 "*" at 3982.88,9002.58 h50
U2: Top Overlay "*" at 4498.35,8162.46 h50 r180; Mechanical 13 "*" at 4462.85,8200.46 h50 r180
U3: Top Overlay "*" at 3757.77,7644.39 h50 r180; Mechanical 13 "*" at 3718.63,7687.39 h50 r180